# Altium PCB video.altium-saved.PcbDoc (part 4 of 5)
Units mil, origin at the board's own origin, x right, y up, seen from the top; angles counter-clockwise.
Board outline 12285 x 4200 mil, 4 copper layers (top_copper, Mid-Layer 1, Mid-Layer 2, Bottom Layer), stack 68.6 mil thick; 189 components, 588 nets, 2118 pads, 808 vias.
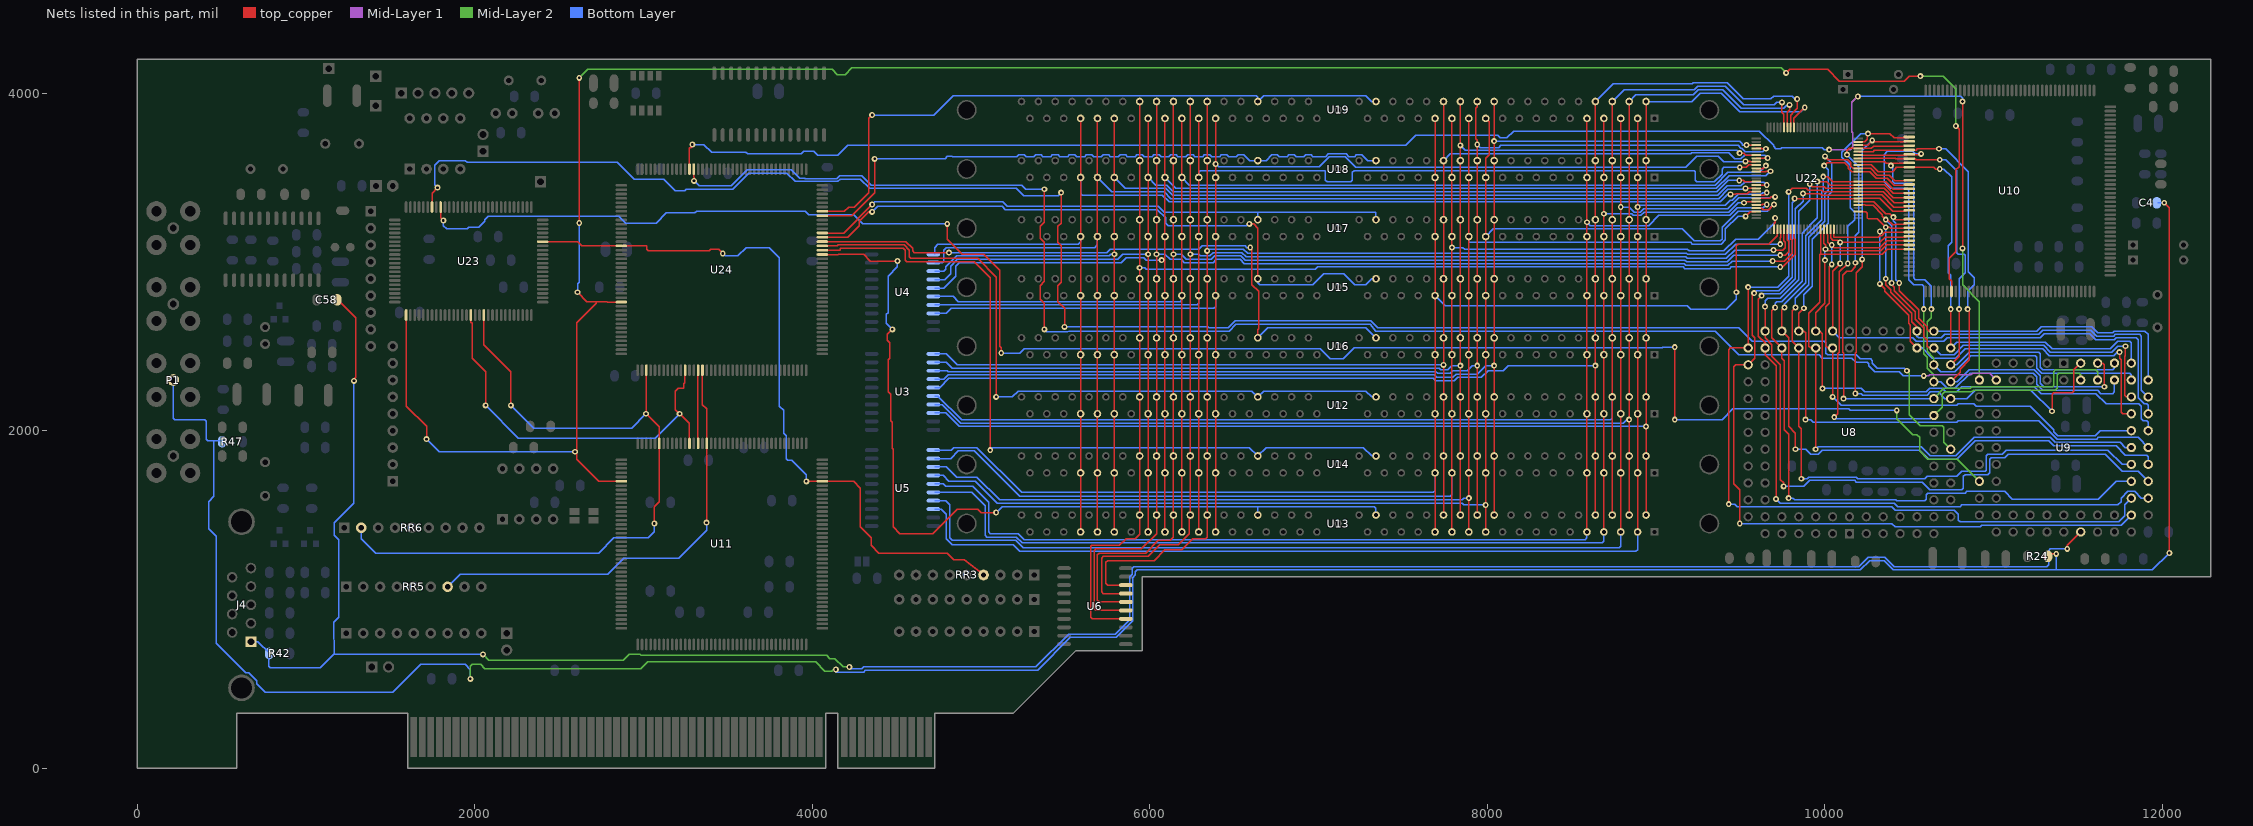
[diagram p6: the nets of this part, all layers, seen from the top]

## Via types
v1: diameter 35, hole 15.75, top_copper to Bottom Layer, 807 vias
v2: diameter 31.5, hole 15.75, top_copper to Bottom Layer, 1 vias

## Nets (pads, with @x,y where several pads share a name; then routed paths per layer and width w, separated by ;. In a path a pad name is that pad's centre, name@x,y a point inside that pad or via, vN(x,y) a via of type N, cw(c..) or ccw(c..) an arc to the next point about the centre after c; other vN are vias at no path point) (continued)
/PTRDY-: RR6.2 U11.115 U23.19 U24.3 | length 4370
  top_copper w7.87: U23.19@2055,2690 2055,2510 2215,2350 v1(2215,2150) ; v1(3015,2100) v1@3016,2100 ; U24.3@3016,2340 v1@3016,2100 ; v1(3065,1450) 3065,1550 3093,1578 3093,1943 3093,2023 v1@3016,2100
  Bottom Layer w7.87: RR6.2@1328.58,1425 1328.58,1360.43 1414.02,1275 2735,1275 2825,1365 3030,1365 3065,1400 v1(3065,1450) ; v1(2215,2150) 2350,2015 2930,2015 v1(3015,2100)
/PTWR: U11.108 U23.16 U24.12 | length 2349.1
  top_copper w7.87: U23.16@1978,2690 1978,2640 1985,2640 1985,2430 2065,2350 v1(2065,2150) ; U24.12@3246,2340 3246,2280 3240,2280 3240,2250 3205,2250 3190,2235 3190,2125 v1(3215,2100) 3272,2043 U11.108@3272,1943
  Bottom Layer w7.87: v1(2065,2150) 2260,1955 3070,1955 v1(3215,2100)
/RAS0-: U19.34 U19.44 U24.74 | length 3862
  top_copper w7.87: U24.74@4078,3299 4190,3299 4216,3325 4250,3325 4335,3410 4335,3850 v1(4355,3870)
  Bottom Layer w7.87: v1(4355,3870) 4720,3870 4835,3985 6630,3985 6640,3975 U19.44@6640,3950 6675,3985 7280,3985 7315,3950 U19.34@7340,3950
/RAS1-: U18.34 U18.44 U24.73 | length 3720
  top_copper w7.87: U24.73@4078,3274 4234,3274 4370,3410 v1(4370,3610.63)
  Bottom Layer w7.87: v1(4370,3610.63) 4787.15,3610.63 4800.9,3624.37 4829.1,3624.37 4829.35,3624.13 5213.25,3624.13 5223.5,3634.37 5256.5,3634.37 5266.75,3624.13 5313.25,3624.13 5323.5,3634.37 5356.5,3634.37 5366.75,3624.13 5413.25,3624.13 5423.5,3634.37 5456.5,3634.37 5466.75,3624.13 5513.25,3624.13 5523.5,3634.37 5556.5,3634.37 5566.75,3624.13 5613.25,3624.13 5623.5,3634.37 5656.5,3634.37 5666.75,3624.13 5713.25,3624.13 5723.5,3634.37 5756.5,3634.37 5766.75,3624.13 5813.25,3624.13 5823.5,3634.37 5856.5,3634.37 5866.75,3624.13 5913.25,3624.13 5923.5,3634.37 5956.5,3634.37 5966.75,3624.13 6013.25,3624.13 6023.5,3634.37 6056.5,3634.37 6066.75,3624.13 6113.25,3624.13 6123.5,3634.37 6156.5,3634.37 6166.75,3624.13 6213.25,3624.13 6223.5,3634.37 6256.5,3634.37 6266.75,3624.13 6313.25,3624.13 6323.5,3634.37 6356.5,3634.37 6366.75,3624.13 6413.25,3624.13 6423.5,3634.37 6456.5,3634.37 6466.75,3624.13 6513.25,3624.13 6523.5,3634.37 6556.5,3634.37 6590.87,3600 U18.44@6640,3600 6689.13,3600 6723.5,3634.37 6756.5,3634.37 6766.75,3624.13 6813.25,3624.13 6823.5,3634.37 6856.5,3634.37 6866.75,3624.13 6913.25,3624.13 6923.5,3634.37 6956.5,3634.37 6966.75,3624.13 7041.68,3624.13 7056.68,3639.13 7163.32,3639.13 7178.32,3624.13 7213.25,3624.13 7223.5,3634.37 7256.5,3634.37 7290.87,3600 U18.34@7340,3600
/RAS2-: U17.34 U17.44 U24.69 | length 3453.1
  top_copper w7.87: U24.69@4078,3171 4186,3171 v1(4355,3340)
  Bottom Layer w7.87: v1(4355,3340) 4370,3355 5130,3355 5155,3330 6050,3330 6085,3295 6640,3295 ; U17.44@6640,3250 6640,3295 ; U17.34@7340,3250 7340,3295 6640,3295
/RAS3-: U15.34 U15.44 U24.68 | length 3830.1
  top_copper w7.87: U24.68@4078,3146 4210,3146 4279,3215 4279,3240 4335,3296 v1(4355,3296) ; v1(6590,3225) 6615,3225 6640,3200 U15.44@6640,2900
  Bottom Layer w7.87: v1(4355,3296) 4389,3330 5125,3330 5145,3310 6045,3310 6095,3260 6095,3230 6110,3215 6570,3215 6580,3225 v1(6590,3225) ; U15.44@6640,2900 6640,2875 6650,2865 6965,2865 7030,2930 7150,2930 7215,2865 7280,2865 7315,2900 U15.34@7340,2900
/RAS4-: U16.34 U16.44 U24.67 | length 3883.8
  top_copper w7.87: U24.67@4078,3120 4555,3120 4595,3080 4595,3065 4605,3055 v1(4810,3055) ; v1(6595,3085) 6605,3075 6605,2865 6645,2825 6645,2600 6640,2600 U16.44@6640,2550
  Bottom Layer w7.87: v1(4810,3055) 5745,3055 5765,3075 6290,3075 6310,3095 6565,3095 6575,3085 v1(6595,3085) ; U16.44@6640,2550 6700,2610 7280,2610 U16.34@7340,2550
/RAS5-: U12.34 U12.44 U24.66 | length 4137.1
  top_copper w7.87: U24.66@4078,3095 4150,3095 4150,3100 4545,3100 4575,3070 4575,3030 4585,3020 4980,3020 5090,2910 v1(5090,2200)
  Bottom Layer w7.87: v1(5090,2200) 5185,2200 5220,2235 6605,2235 U12.44@6640,2200 6675,2235 7280,2235 7315,2200 U12.34@7340,2200
/RAS6-: U14.34 U14.44 U24.65 | length 4469
  top_copper w7.87: U24.65@4078,3069 4165,3069 4165,3080 4540,3080 4550,3070 4550,3010 4560,3000 4960,3000 5055,2905 v1(5055,1885)
  Bottom Layer w7.87: v1(5055,1885) 5070,1900 6590,1900 U14.44@6640,1850 6690,1900 7265,1900 7315,1850 U14.34@7340,1850
/RAS7-: U13.34 U13.44 U24.64 | length 5150.8
  top_copper w7.87: U24.64@4078,3043 4155,3043 4155,3045 4305,3045 4345,3005 v1(4505,3005) ; v1(4475,2600) 4445,2570 4445,2535 4460,2520 4460,2430 4450,2420 4450,2230 4465,2215 4465,2060 4475,2050 4475,1895 4480,1890 4480,1430 4520,1390 4715,1390 4860,1535 4980,1535 5000,1515 v1(5090,1515)
  Bottom Layer w7.87: v1(4475,2600) 4440,2635 4440,2690 4450,2700 4450,2915 4505,2970 v1(4505,3005) ; v1(5090,1515) 5125,1550 6640,1550 ; U13.44@6640,1500 6640,1550 ; U13.34@7340,1500 7340,1540 7330,1550 6640,1550
/RDCAD-: U8.20 U23.74 | length 10848.6
  top_copper w7.87: U23.74@1748,3320 1748,3408 v1(1780,3440) ; v1(5475,3410) 5475,3230 5455,3210 5455,3115 5475,3095 5475,2880 5455,2860 5455,2765 5495,2725 v1(5495,2615)
  Mid-Layer 2 w7.87: v1(10485,2355) 10500,2340 10500,2095 10565,2030 10695,2030 10705,2020 10705,1930 U8.20@10745,1890
  Bottom Layer w7.87: v1(1780,3440) 1762.5,3457.5 1762.5,3572.5 1790,3600 1945,3600 1955.75,3589.25 2845.75,3589.25 2945,3490 3120,3490 3190,3420 3245,3420 3255,3430 3530,3430 3625,3525 3850,3525 3898.76,3476.24 4056.31,3476.24 4056.43,3476.36 4123.57,3476.36 4123.69,3476.24 4152.21,3476.24 4165.97,3490 4285,3490 4340,3435 5210,3435 5252.5,3392.5 5457.5,3392.5 v1(5475,3410) ; v1(5495,2615) 6345,2615 6350,2610 6465,2610 6505,2650 7310,2650 7350,2610 9490,2610 9570,2530 9995,2530 10005,2520 10005,2460 10015,2450 10185,2450 10210,2425 10270,2425 10280,2415 10280,2400 10310,2370 10470,2370 v1(10485,2355)
/RDCDA-: U9.22 U23.72 | length 10760.2
  top_copper w7.87: U23.72@1799,3320 1800,3320 1800,3260 v1(1815,3245) ; v1(4800,3225) 4800,3135 4890,3045 5015,3045 5110,2950 5110,2500 5120,2490 v1(5120,2460) ; v1(9110,2065) v1(9110,2495)
  Mid-Layer 2 w7.87: v1(10425,2120) 10425,2070 10520,1975 10545,1975 10560,1960 10560,1880 10610,1830 10785,1830 U9.22@10915,1700
  Bottom Layer w7.87: v1(1815,3245) 1815,3215 1835,3195 1955,3195 1965,3205 2025,3205 2060,3240 2060,3250 2080,3270 2855,3270 2895,3230 3075,3230 3135,3290 3305,3290 3315,3300 3960,3300 3980,3280 4245,3280 4300,3225 v1(4800,3225) ; v1(5120,2460) 5230,2460 5255,2485 7010,2485 7070,2425 7145,2425 7210,2490 9035,2490 9040,2495 v1(9110,2495) ; v1(9110,2065) 9390,2065 9455,2130 10140,2130 10150,2120 v1(10425,2120)
/RDEMPTY: U11.106 U24.15 | length 397
  top_copper w7.87: U11.106@3323,1943 U24.15@3323,2340
/RDFIFO-: RR5.7 U11.104 U24.16 | length 2613.7
  top_copper w7.87: U24.16@3349,2340 3349,2155 3374,2130 3374,1943 v1(3374,1455)
  Bottom Layer w7.87: RR5.7@1840,1075 1915,1150 2790,1150 2885,1245 3210,1245 3365,1400 3365,1401 3374,1410 v1(3374,1455)
/RED_IN: C4.2 P1.1 R24.1 R47.1 | length 16629.7
  top_copper w7.87: R24.1@11325,1255 11325,1270 v1(11370,1270) ; v1(12010,3350) 12040,3320 v1(12040,1275)
  Mid-Layer 2 w7.87: v1(1975,530) 1975,605 1985,615 2035,615 2060,590 2985,590 3025,630 4020,630 4075,575 4115,575 4125,585 v1(4140,585)
  Bottom Layer w7.87: P1.1@215,2300 215,2075 225,2065 400,2065 410,2055 410,1950 420,1940 455,1940 ; R47.1@500,1935 500,1940 455,1940 ; v1(1975,530) 1975,585 1945,615 1680,615 1515,450 760,450 709.65,500.35 709.65,519.45 662.56,566.54 643.46,566.54 470,740 470,1375 425,1420 425,1580 455,1610 455,1940 ; v1(4140,585) 4140,570 4305,570 4315,580 5335,580 5530,775 5800,775 5900,875 5900,1130 5915,1145 5915,1165 5925,1175 10210,1175 10265,1230 10350,1230 10405,1175 11370,1175 ; v1(11370,1270) 11370,1175 ; C4.2@11970,3350 v1(12010,3350) ; v1(12040,1275) 11940,1175 11370,1175
/RED_OUT: C58.2 J4.1 R42.2 U9.37 | length 13900.6
  top_copper w7.87: C58.2@1190,2775 1295,2670 1295,2315 1285,2305 v1(1285,2295) ; v1(11435,1300) 11435,1320 U9.37@11515,1400
  Mid-Layer 2 w7.87: v1(2050,675) 2085,640 2880,640 2915,675 2980,675 2985,670 4085,670 4105,650 4135,650 4185,600 v1(4220,600)
  Bottom Layer w7.87: J4.1@665,750 715,750 785,680 780,680 780,605 790,595 1085,595 1165,675 ; v1(1285,2295) 1285,1570 1169.53,1454.53 1169.53,1380.34 1195.81,1354.06 1195.81,908.54 1195,907.73 1195,895 1165,865 1165,763.38 1169.31,759.07 1169.31,679.31 1165,675 ; v1(2050,675) 1165,675 ; v1(4220,600) 4230,590 4295,590 4305,600 5325,600 5520,795 5795,795 5880,880 5880,1135 5895,1150 5895,1185 5905,1195 10200,1195 10255,1250 10355,1250 10410,1195 11315,1195 11325,1205 11325,1290 11335,1300 v1(11435,1300)
/SELECT-: RR3.4 U11.75 U23.45 U24.135 | length 4346.4
  top_copper w7.87: U23.45@2400,3120 2610,3120 2635,3095 2850,3095 3020,3095 3020,3075 3030,3065 3390,3065 3400,3075 3445,3075 v1(3470,3050) ; v1(3965,1700) 4078,1700 4245,1700 4285,1660 4285,1430 4350,1365 4350,1320 4395,1275 4800,1275 4840,1235 4900,1235 RR3.4@5015,1145
  Bottom Layer w7.87: v1(3470,3050) 3485,3035 3560,3035 3610,3085 3745,3085 3805,3025 3805,2145 3830,2120 3830,1985 3845,1970 3845,1835 3855,1825 3880,1825 3965,1740 v1(3965,1700)
/SYSRST-: U10.87 U11.126 U23.1 U24.148 | length 14093.3
  top_copper w7.87: U23.1@1594,2690 1594,2146 1715,2025 v1(1715,1950) ; v1(2595,1875) v1@2605,1875 ; v1(2610,2820) 2665,2765 2720,2765 ; v1(2620,3230) v1(2620,4090) ; U11.126@2850,1700 2735,1700 2605,1830 v1@2605,1875 ; U24.148@2850,2762 2785,2762 2785,2765 2720,2765 ; v1(9770,4120) 9790,4140 10015,4140 10085,4070 10470,4070 10500,4100 v1(10565,4100) ; U10.87@10751,2802 10751,2885 10735,2901 10735,3020 10775,3060 10775,3545 10795,3565 10795,3785 v1(10775,3805) ; v1@2605,1875 2605,2640 2720,2755 2720,2765
  Mid-Layer 2 w7.87: v1(2620,4090) 2670,4140 4117.84,4140 4147.84,4110 4195,4110 4235,4150 9740,4150 v1(9770,4120) ; v1(10565,4100) 10700,4100 10775,4025 v1(10775,3805)
  Bottom Layer w7.87: v1(1715,1950) 1790,1875 v1(2595,1875) ; v1(2610,2820) 2610,2870 2620,2880 v1(2620,3230)
/TVB0: U8.32 U9.61 U10.55 U22.92 | length 2877.4
  top_copper w7.87: U22.92@10200,3574 10275,3574 10315,3535 10400,3535 10420,3555 10420,3560 10480,3560 10482,3557 10490,3560 10645,3560 10655,3550 v1(10680,3550) ; U8.32@10745,2490 v1(10745,2720)
  Bottom Layer w7.87: v1(10680,3550) 10705,3550 10750,3505 10750,3115 10730,3095 10730,2935 10745,2920 v1(10745,2720) ; U8.32@10745,2490 10780,2525 11305,2525 11345,2485 11690,2485 11735,2530 11805,2530 11815,2520 U9.61@11815,2400
/TVB1: U8.31 U9.62 U10.54 U22.93 | length 3045.4
  top_copper w7.87: U22.93@10200,3594 10355,3594 10364,3585 v1@10390,3585 ; v1(10390,3570) v1@10390,3585 ; U10.54@10485,3585 v1@10390,3585
  Mid-Layer 2 w7.87: v1(10630,2720) 10630,2670 10605,2645 10605,2470 10645,2430 U8.31@10645,2390
  Bottom Layer w7.87: v1(10390,3570) 10400,3560 10400,3475 10410,3465 10515,3465 10525,3455 10525,2905 10535,2895 10590,2895 10630,2855 v1(10630,2720) ; U8.31@10645,2390 10685,2350 10770,2350 10865,2445 11245,2445 11255,2435 11255,2370 11285,2340 11805,2340 11815,2330 U9.62@11815,2300
/TVB2: U8.30 U9.63 U10.53 U22.94 | length 2964.1
  top_copper w7.87: U22.94@10198.15,3613.11 10416.89,3613.11 10418.07,3611.93 10495.79,3611.93 10533.78,3611.93 10540.71,3605 v1(10680,3605) ; U8.30@10745,2390 10795,2440 v1(10795,2720)
  Bottom Layer w7.87: v1(10680,3605) 10715,3605 10780,3540 10780,3055 10790,3045 10825,3045 10830,3040 10830,2935 10795,2900 v1(10795,2720) ; U8.30@10745,2390 10780,2390 10855,2465 11265,2465 11275,2455 11275,2375 11290,2360 11705,2360 11715,2370 U9.63@11715,2400
/TVB3: U8.29 U9.64 U10.52 U22.95 | length 3439.1
  top_copper w7.87: U22.95@10200,3633 10485,3633 10482,3634 10485,3635 10565,3635 v1(10570,3640)
  Mid-Layer 2 w7.87: v1(10585,2720) 10585,2455 10605,2435 10605,2370 10645,2330 U8.29@10645,2290
  Bottom Layer w7.87: v1(10570,3640) 10535,3640 10520,3655 10370,3655 10350,3635 10350,3475 10390,3435 10485,3435 10495,3425 10495,2895 10525,2865 10575,2865 10585,2855 v1(10585,2720) ; U8.29@10645,2290 10685,2290 10725,2250 10770,2250 10860,2340 11235,2340 11255,2320 11255,2275 11290,2240 11615,2240 11635,2220 11705,2220 11715,2230 U9.64@11715,2300
/TVB4: U8.28 U9.65 U10.51 U22.96 | length 3233.6
  top_copper w7.87: U22.96@10200,3653 10285,3653 10292,3660 U10.51@10480,3660 ; U10.51@10482,3659 U10.51@10480,3660 ; v1(10675,3670) 10545,3670 10545,3660 U10.51@10480,3660 ; U8.28@10745,2290 10800,2345 10800,2365 10855,2420 10855,2720 v1(10845,2720) ; U9.65@11615,2400 11645,2400 11655,2390 v1(11655,2260)
  Bottom Layer w7.87: v1(10675,3670) 10715,3670 10850,3535 10850,2940 10885,2905 10885,2865 10845,2825 v1(10845,2720) ; U8.28@10745,2290 10785,2290 10855,2360 11240,2360 11275,2325 11275,2280 11295,2260 v1(11655,2260)
/TVB5: U8.27 U9.66 U10.50 U22.97 | length 3596.8
  top_copper w7.87: v1(10110,2190) 10110,2460 10105,2465 10105,2920 10130,2945 10155,2945 10180,2970 v1(10180,2995) ; v1(10130,3635) 10130,3659.75 10142.42,3672.17 10198.15,3672.17 10274.83,3672.17 10275,3672 10288,3685 U10.50@10482,3685
  Mid-Layer 2 w7.87: U8.27@10645,2190 10705,2250 10860,2250 10870,2260 11350,2260 11355,2265 11355,2350 11365,2360 11605,2360 11615,2350 U9.66@11615,2300
  Bottom Layer w7.87: v1(10110,2190) U8.27@10645,2190 ; v1(10130,3635) 10200,3565 10200,3175 10180,3155 v1(10180,2995)
/TVB6: U8.26 U9.67 U10.49 U22.98 | length 3525.1
  top_copper w7.87: v1(10180,2220) 10180,2460 10185,2465 10185,2935 10220,2970 v1(10220,3015) ; U22.98@10200,3692 10252,3692 v1(10280,3720) 10289,3711 U10.49@10482,3711 ; v1(11345,2115) 11345,2215 11355,2225 11465,2225 11475,2235 11475,2360 U9.67@11515,2400
  Bottom Layer w7.87: v1(10180,2220) 10215,2220 10225,2210 10605,2210 10625,2230 10670,2230 10710,2190 U8.26@10745,2190 10840,2190 10890,2240 11220,2240 v1(11345,2115) ; v1(10220,3015) 10220,3660 v1(10280,3720)
/TVB7: U8.25 U9.68 U10.48 U22.99 | length 3878.8
  top_copper w7.87: v1(10055,2080) 10075,2100 10075,2455 10085,2465 10085,2940 v1(10135,2990) ; U22.99@10200,3712 10234.73,3712 10250,3727.27 10250,3755 v1(10255,3760) 10385,3760 10409,3736 U10.48@10482,3736
  Mid-Layer 2 w7.87: U8.25@10645,2090 10695,2140 10695,2215 10710,2230 10870,2230 10880,2240 11365,2240 11375,2250 11375,2330 11385,2340 11505,2340 11515,2330 U9.68@11515,2300
  Bottom Layer w7.87: v1(10055,2080) 10065,2070 10625,2070 U8.25@10645,2090 ; v1(10135,2990) 10135,3210 10175,3250 10175,3295 10150,3320 10150,3571.62 10100.69,3620.93 10100.69,3649.07 10211.62,3760 v1(10255,3760)
/TVG0: U8.48 U9.53 U10.74 U22.67 | length 3854.6
  top_copper w7.87: v1(9945,1890) U8.48@9945,2490 9915,2490 9905,2500 9905,2695 9970,2760 9970,3045 ; U22.67@9974,3190 9974,3049 9970,3045 ; U10.74@10480,3075 10370,3075 10340,3045 9970,3045
  Bottom Layer w7.87: v1(9945,1890) 9960,1905 10570,1905 10625,1850 10775,1850 10885,1960 11335,1960 11365,1930 11750,1930 11780,1900 U9.53@11815,1900
/TVG1: U8.47 U9.54 U10.73 U22.68 | length 3640.7
  top_copper w7.87: v1(9985,2250) 9985,2575 9970,2590 U8.47@9945,2590 9945,2700 10000,2755 v1(10000,3010) ; U22.68@9994,3190 9994,3109.06 10003.31,3099.75 v1(10003.31,3075) 10013.31,3065 10330,3065 10365,3100 U10.73@10478,3100
  Bottom Layer w7.87: v1(9985,2250) 10215,2250 10235,2230 10600,2230 10620,2250 10695,2250 10715,2230 10780,2230 10810,2260 11240,2260 11280,2220 11605,2220 11665,2160 11860,2160 11875,2145 11875,2070 11885,2060 11905,2060 11915,2050 U9.54@11915,2000 ; v1(10000,3010) 10000,3071.69 v1(10003.31,3075)
/TVG2: U8.46 U9.55 U10.72 U22.69 | length 3411.5
  top_copper w7.87: U22.69@10013,3190 10013,3160 10015,3160 10015,3115 10030,3100 v1(10040,3100) 10055,3085 10325,3085 10365,3125 U10.72@10480,3125 ; v1(10040,2985) 10025,2970 10025,2755 10005,2735 10005,2500 10015,2490 U8.46@10045,2490 v1(10045,2200)
  Bottom Layer w7.87: v1(10040,2985) v1(10040,3100) ; v1(10045,2200) 10095,2150 10780,2150 10790,2160 10880,2160 10895,2145 11215,2145 11355,2005 11355,1995 11380,1970 11600,1970 11630,2000 U9.55@11815,2000
/TVG3: U8.45 U9.56 U10.71 U22.70 | length 3414.7
  top_copper w7.87: U22.70@10033,3190 10033,3142.73 10046.48,3129.25 10076.44,3129.25 v1(10090,3115.69) 10325.69,3115.69 10357,3147 U10.71@10482,3147 ; U8.45@10045,2590 10045,2945 v1(10090,2990)
  Bottom Layer w7.87: U8.45@10045,2590 10085,2550 10520,2550 10540,2530 10705,2530 10725,2550 11275,2550 11300,2575 11570,2575 11605,2540 11715,2540 11725,2550 11845,2550 11855,2540 11855,2195 11890,2160 11905,2160 11915,2150 U9.56@11915,2100 ; v1(10090,2990) v1(10090,3115.69)
/TVG4: U8.36 U9.57 U10.70 U22.71 | length 2991.3
  top_copper w7.87: U22.71@10053,3190 10053,3145 10315,3145 10325,3155 ; v1(10325,2870) 10355,2840 10355,2825 10495,2685 10495,2635 10505,2625 10505,2530 U8.36@10545,2490 ; v1(10325,3180) 10325,3155 ; U10.70@10485,3175 10355,3175 10335,3155 10325,3155 ; v1(11745,2465) 11745,2430 11755,2420 11755,2110 11765,2100 U9.57@11815,2100
  Bottom Layer w7.87: v1(10325,2870) v1(10325,3180) ; U8.36@10545,2490 10575,2490 10635,2430 10775,2430 10830,2485 11290,2485 11330,2445 11710,2445 11730,2465 v1(11745,2465)
/TVG5: U8.35 U9.58 U10.69 U22.78 | length 2813.8
  top_copper w7.87: U22.78@10198.15,3298.15 10241.85,3298.15 10250.69,3289.31 10250.69,3259.31 10255,3255 10310,3255 v1(10360,3205) 10385,3205 10390,3200 U10.69@10480,3200 ; v1(10360,2900) 10360,2865 10390,2835 10390,2820 10515,2695 10515,2645 10545,2615 U8.35@10545,2590
  Bottom Layer w7.87: v1(10360,2900) v1(10360,3205) ; U8.35@10545,2590 10545,2560 10555,2550 10690,2550 10710,2570 11265,2570 11290,2595 11575,2595 11610,2560 11710,2560 11720,2570 11865,2570 11875,2560 11875,2240 U9.58@11915,2200
/TVG6: U8.34 U9.59 U10.68 U22.80 | length 2779.7
  top_copper w7.87: U22.80@10200,3338 10240,3338 10240,3335 10285,3335 10340,3280 10340,3270 v1(10360,3250) 10370,3250 10400,3220 10420,3220 10420,3224 U10.68@10482,3224 ; v1(10395,2875) 10395,2865 10410,2850 10410,2830 10535,2705 10535,2660 10585,2610 10585,2555 10605,2535 10605,2500 10615,2490 U8.34@10645,2490 ; v1(11780,2500) 11780,2445 11775,2440 11775,2210 11785,2200 U9.59@11815,2200
  Bottom Layer w7.87: v1(10360,3250) 10395,3215 v1(10395,2875) ; U8.34@10645,2490 10685,2450 10765,2450 10820,2505 11295,2505 11335,2465 11700,2465 11735,2500 v1(11780,2500)
/TVG7: U8.33 U9.60 U10.67 U22.81 | length 2699.7
  top_copper w7.87: U22.81@10200,3357 10250,3357 10250,3355 10290,3355 10360,3285 10385,3285 v1(10405,3265) 10415,3255 10415,3250 U10.67@10482,3250 ; v1(10440,2875) 10440,2830 10555,2715 10555,2665 10605,2615 10605,2600 10615,2590 U8.33@10645,2590
  Bottom Layer w7.87: v1(10405,3265) 10405,3245 10420,3230 10420,2895 v1(10440,2875) ; U8.33@10645,2590 11255,2590 11280,2615 11580,2615 11615,2580 11705,2580 11715,2590 11895,2590 11915,2570 U9.60@11915,2300
/TVI0: U9.10 U24.108 | length 9837.4
  top_copper w7.87: U24.108@3272,3568 3272,3675 3280,3675 3290,3685 v1(3290,3695) ; v1(10815,3080) v1(10815,3950)
  Mid-Layer 1 w7.87: v1(10025,3665) 10150,3665 10165.94,3680.94 10165.94,3766.09 10160,3772.03 10160,3945 v1(10195,3980)
  Mid-Layer 2 w7.87: v1(10815,3080) 10815,2865 10915,2765 U9.10@10915,2300
  Bottom Layer w7.87: v1(3290,3695) 3357.55,3695 3403.42,3649.13 3607.58,3649.13 3616.95,3639.75 3934.1,3639.75 3949.41,3655.06 4009.02,3655.06 4033.25,3630.83 4150.83,3630.83 4210,3690 7515,3690 7575,3750 8060,3750 8075,3735 8115,3735 8155,3775 9610.65,3775 9695.06,3690.59 9695.06,3684.45 9708.82,3670.69 9739.07,3670.69 9743.38,3675 9985,3675 9995,3665 v1(10025,3665) ; v1(10195,3980) 10805,3980 10815,3970 v1(10815,3950)
/TVI1: U9.11 U24.107 | length 8973.3
  top_copper w7.87: U24.107@3297,3568 3297,3500 3300,3500 v1(3300,3480) ; v1(5375,2600) 5375,2755 5350,2780 5350,2860 5375,2885 5375,3115 5350,3140 5350,3210 5375,3235 v1(5375,3430)
  Mid-Layer 1 w7.87: v1(10585,2325) 10615,2325 10620,2330 10865,2330 10875,2340 10975,2340 U9.11@11015,2300
  Bottom Layer w7.87: v1(3300,3480) 3330,3450 3520,3450 3615,3545 3875,3545 3925.43,3494.57 3956.87,3494.57 3959.47,3491.97 4049.8,3491.97 4049.92,3492.09 4144.95,3492.09 4145.07,3491.97 ; 4145.08,3491.97 4145.2,3492.09 4145.4,3492.09 4147.88,3494.57 4148.08,3494.57 4163.52,3510 4295,3510 4350,3455 5240,3455 5265,3430 v1(5375,3430) ; v1(5375,2600) 5390,2585 5515,2585 5520,2590 6470,2590 6510,2630 7305,2630 7340,2590 9350,2590 9490,2450 9965,2450 9985,2430 10160,2430 10185,2405 10250,2405 10260,2395 10260,2385 10295,2350 10440,2350 10465,2325 v1(10585,2325)
/TVR0: U8.56 U9.45 U10.65 U22.82 | length 5274.5
  top_copper w7.87: v1(9495,1450) 9495,1650 9460,1685 9460,2380 9470,2390 U8.56@9545,2390 9585,2430 9585,2550 9570,2565 9570,2805 v1(9580,2815) ; v1(9820,3375) 10200,3375 10200,3377 10325,3377 10402,3300 10480,3300 U10.65@10482,3301
  Bottom Layer w7.87: v1(9495,1450) 10395,1450 10415,1430 10920,1430 10930,1440 11755,1440 U9.45@11815,1500 ; v1(9580,2815) 9595,2830 9725,2830 9805,2910 9805,3350 9820,3365 v1(9820,3375)
/TVR1: U8.55 U9.46 U10.64 U22.83 | length 4959.2
  top_copper w7.87: v1(9625,2800) 9605,2780 9605,2560 9645,2520 U8.55@9645,2490 9645,2450 9710,2385 v1(9710,1595) ; v1(9870,3405) 9970,3405 9980,3395 10200,3395 10200,3397 10335,3397 10407,3325 10470,3325 U10.64@10482,3327
  Bottom Layer w7.87: v1(9625,2800) 9635,2810 9735,2810 9825,2900 9825,3315 9870,3360 v1(9870,3405) ; v1(9710,1595) 9735,1570 10410,1570 10430,1550 10800,1550 10810,1560 11735,1560 11755,1580 11755,1600 11795,1640 11835,1640 11875,1600 U9.46@11915,1600
/TVR2: U8.54 U9.47 U10.63 U22.84 | length 5447.9
  top_copper w7.87: v1(9430,1565) 9430,2480 9440,2490 U8.54@9545,2490 v1(9545,2850) ; v1(9785,3415) 9805,3435 9890,3435 9900,3425 9980,3425 9990,3415 10200,3415 10200,3416 10345,3416 10410,3351 10480,3351 U10.63@10482,3352
  Bottom Layer w7.87: v1(9430,1565) 9465,1565 9480,1550 10395,1550 10415,1530 10765,1530 10790,1505 10790,1470 10800,1460 11740,1460 11775,1495 11775,1560 U9.47@11815,1600 ; v1(9545,2850) 9720,2850 9785,2915 v1(9785,3415)
/TVR3: U8.53 U9.48 U10.62 U22.85 | length 5034.4
  top_copper w7.87: v1(9645,2735) U8.53@9645,2590 9645,2550 9685,2510 9685,2440 9735,2390 9735,1710 9755,1690 v1(9755,1670) ; v1(9910,3460) 9925,3445 9995,3445 10005,3435 10200,3435 10200,3436 10350,3436 10405,3381 10475,3381 U10.62@10482,3378
  Bottom Layer w7.87: v1(9645,2735) 9645,2770 9660,2785 9735,2785 9845,2895 9845,3300 9910,3365 v1(9910,3460) ; v1(9755,1670) 9875,1670 9910,1705 10175,1705 10185,1695 10575,1695 10620,1650 10810,1650 10820,1660 10820,1730 10830,1740 10965,1740 10975,1750 10975,1830 10985,1840 11065,1840 11085,1860 11660,1860 11760,1760 11855,1760 U9.48@11915,1700
/TVR4: U8.52 U9.49 U10.61 U22.86 | length 4739.2
  top_copper w7.87: v1(9705,2730) 9685,2710 9685,2550 U8.52@9745,2490 9745,2430 9760,2415 9760,2005 9785,1980 v1(9785,1600) ; v1(9955,3475) 10010,3475 10030,3455 10200,3455 10200,3456 10355,3456 10405,3406 10475,3406 U10.61@10482,3403
  Bottom Layer w7.87: v1(9705,2730) 9705,2755 9715,2765 9745,2765 9865,2885 9865,3170 9955,3260 v1(9955,3475) ; v1(9785,1600) 9810,1600 9820,1590 10420,1590 10425,1585 10590,1585 10600,1595 10600,1620 10610,1630 10830,1630 10840,1640 11065,1640 11110,1595 11620,1595 11725,1700 U9.49@11815,1700
/TVR5: U8.51 U9.50 U10.60 U22.87 | length 4540
  top_copper w7.87: v1(9760,2730) 9745,2715 U8.51@9745,2590 9785,2550 9785,2025 9825,1985 v1(9825,1890) ; v1(9990,3505) 10015,3505 10045,3475 10200,3475 10200,3476 10360,3476 10405,3431 10480,3431 U10.60@10482,3429
  Bottom Layer w7.87: v1(9760,2730) 9760,2750 9885,2875 9885,3155 9980,3250 9980,3415 9990,3425 v1(9990,3505) ; v1(9825,1890) 9885,1890 9915,1860 9960,1860 9985,1885 10560,1885 10615,1830 10780,1830 10890,1940 11325,1940 11355,1910 11725,1910 11780,1855 11905,1855 11915,1845 U9.50@11915,1800
/TVR6: U8.50 U9.51 U10.59 U22.90 | length 4651.1
  top_copper w7.87: v1(9825,2730) 9805,2710 9805,2530 U8.50@9845,2490 9845,2025 9860,2010 v1(9860,1715) ; v1(9995,3570) 10012.5,3587.5 10117.5,3587.5 10138.03,3566.97 10138.03,3554.92 10158.58,3534.37 U22.90@10196.67,3534.37 ; U22.90@10198.15,3534.37 10264.37,3534.37 10265,3535 10305,3495 10370,3495 10410,3455 U10.59@10482,3455
  Bottom Layer w7.87: v1(9825,2730) 9825,2785 9905,2865 9905,3145 10000,3240 10000,3405 10020,3425 10020,3545 v1(9995,3570) ; v1(9860,1715) 9895,1715 9905,1725 10185,1725 10195,1715 10590,1715 10605,1730 10780,1730 10810,1760 10950,1760 10955,1765 10955,1850 10965,1860 11050,1860 11075,1885 11675,1885 11760,1800 U9.51@11815,1800
/TVR7: U8.49 U9.52 U10.58 U22.91 | length 4383.6
  top_copper w7.87: v1(9875,2725) 9845,2695 U8.49@9845,2590 9875,2590 9885,2580 v1(9885,2065) ; v1(10000,3625) 10019.31,3605.69 10134.51,3605.69 10153.78,3586.42 10153.78,3566.73 10166.46,3554.06 U22.91@10196.67,3554.06 ; U22.91@10173.46,3554.92 10195.81,3554.92 U22.91@10196.67,3554.06 ; U10.58@10482,3480 10414,3480 10380,3514 10310,3514 10270,3554 10196.73,3554 U22.91@10196.67,3554.06
  Bottom Layer w7.87: v1(9875,2725) 9875,2805 9925,2855 9925,3135 10020,3230 10020,3395 10040,3415 10040,3585 v1(10000,3625) ; v1(9885,2065) 9915,2065 9930,2050 10780,2050 10790,2060 11265,2060 11375,1950 11610,1950 11620,1960 11855,1960 U9.52@11915,1900
/TVRAM0: U3.18 U12.2 U13.2 U14.2 U15.2 U16.2 U17.2 U18.2 U19.2 U22.17 | length 7856.3
  top_copper w7.87: U13.2@8940,1500 U14.2@8940,1850 U12.2@8940,2200 U16.2@8940,2550 U15.2@8940,2900 U17.2@8940,3250 U18.2@8940,3600 U19.2@8940,3950 ; U22.17@9816,3800 9816,3851 v1(9880,3915)
  Bottom Layer w7.87: U3.18@4725,2105 4790,2105 4870,2025 v1(8940,2025) ; U19.2@8940,3950 9210,3950 9260,4000 9385,4000 9495,3890 9855,3890 v1(9880,3915)
/TVRAM1: U3.17 U12.4 U13.4 U14.4 U15.4 U16.4 U17.4 U18.4 U19.4 U22.19 | length 7789.9
  top_copper w7.87: U13.4@8840,1500 U14.4@8840,1850 v1(8840,2065) U12.4@8840,2200 U16.4@8840,2550 U15.4@8840,2900 U17.4@8840,3250 U18.4@8840,3600 U19.4@8840,3950 ; U22.19@9777,3800 9775,3800 9775,3885 9790,3900 v1(9790,3930)
  Bottom Layer w7.87: U3.17@4725,2155 4770,2155 4880,2045 8805,2045 8825,2065 v1(8840,2065) ; U19.4@8840,3950 8880,3990 9220,3990 9250,4020 9395,4020 9505,3910 9755,3910 9770,3925 9785,3925 v1(9790,3930)
/TVRAM2: U3.16 U12.6 U13.6 U14.6 U15.6 U16.6 U17.6 U18.6 U19.6 U22.20 | length 7897.3
  top_copper w7.87: U13.6@8740,1500 U14.6@8740,1850 U12.6@8740,2200 U16.6@8740,2550 U15.6@8740,2900 U17.6@8740,3250 U18.6@8740,3600 U19.6@8740,3950 ; v1(9745,3945) 9745,3885 9755,3875 9755,3835 9757,3835 U22.20@9757,3800
  Bottom Layer w7.87: U3.16@4725,2205 4745,2205 4885,2065 8730,2065 8740,2075 U12.6@8740,2200 ; U19.6@8740,3950 8810,4020 9225,4020 9245,4040 9410,4040 9520,3930 9700,3930 9715,3945 v1(9745,3945)
/TVRAM3: U3.15 U12.8 U13.8 U14.8 U15.8 U16.8 U17.8 U18.8 U19.8 U22.18 | length 7904.8
  top_copper w7.87: U13.8@8640,1500 U14.8@8640,1850 U12.8@8640,2200 v1(8640,2385) U16.8@8640,2550 U15.8@8640,2900 U17.8@8640,3250 U18.8@8640,3600 U19.8@8640,3950 ; U22.18@9796,3800 9796,3870 9805,3879 9805,3880 9835,3910 v1(9835,3965)
  Bottom Layer w7.87: U3.15@4725,2255 4755,2255 4810,2310 7680,2310 7695,2295 7805,2295 7825,2315 7965,2315 8005,2355 8095,2355 8125,2385 v1(8640,2385) ; U19.8@8640,3950 8745,4055 9215,4055 9220,4060 9420,4060 9515,3965 9680,3965 9695,3980 9805,3980 9820,3965 v1(9835,3965)
/TVRAM4: U3.14 U12.20 U13.20 U14.20 U15.20 U16.20 U17.20 U18.20 U19.20 U22.28 | length 7374.8
  top_copper w7.87: U13.20@8040,1500 U14.20@8040,1850 U12.20@8040,2200 v1(8040,2385) U16.20@8040,2550 U15.20@8040,2900 U17.20@8040,3250 U18.20@8040,3600 v1(8040,3715) U19.20@8040,3950 ; v1(9535,3692) U22.28@9590,3692
  Bottom Layer w7.87: U3.14@4725,2305 4780,2305 4805,2330 7685,2330 7700,2315 7795,2315 7815,2335 7940,2335 7990,2385 v1(8040,2385) ; v1(8040,3715) 9495,3715 9510,3700 9510,3692 v1(9535,3692)
/TVRAM5: U3.13 U12.22 U13.22 U14.22 U15.22 U16.22 U17.22 U18.22 U19.22 U22.29 | length 7504.2
  top_copper w7.87: U13.22@7940,1500 U14.22@7940,1850 U12.22@7940,2200 7940,2390 U16.22@7940,2550 U15.22@7940,2900 U17.22@7940,3250 U18.22@7940,3600 v1(7940,3695) 7940,3720 7930,3730 7930,3910 7940,3920 U19.22@7940,3950 ; U22.29@9590,3672 9623.25,3672 9625.25,3670 v1(9650,3670)
  Bottom Layer w7.87: U3.13@4725,2355 4800,2355 4805,2350 7695,2350 7705,2340 7780,2340 7795,2355 7880,2355 7910,2385 v1(7940,2385) ; v1(7940,3695) 7957.5,3677.5 8067.5,3677.5 8080,3690 9485,3690 9501.77,3673.23 9508.15,3673.23 9528.88,3652.5 9632.5,3652.5 v1(9650,3670)
/TVRAM6: U3.12 U12.24 U13.24 U14.24 U15.24 U16.24 U17.24 U18.24 U19.24 U22.31 | length 7367.6
  top_copper w7.87: U13.24@7840,1500 U14.24@7840,1850 U12.24@7840,2200 v1(7840,2385) U16.24@7840,2550 U15.24@7840,2900 U17.24@7840,3250 U18.24@7840,3600 v1(7840,3690) U19.24@7840,3950 ; v1(9494.08,3643.92) 9518.83,3643.92 9529.75,3633 U22.31@9590,3633
  Bottom Layer w7.87: U3.12@4725,2405 4795,2405 4830,2370 7715,2370 7725,2360 7765,2360 7790,2385 v1(7840,2385) ; v1(7840,3690) 7868.58,3661.42 9476.58,3661.42 v1(9494.08,3643.92)
/TVRAM7: U3.11 U12.26 U13.26 U14.26 U15.26 U16.26 U17.26 U18.26 U19.26 U22.32 | length 7529.1
  top_copper w7.87: U13.26@7740,1500 U14.26@7740,1850 U12.26@7740,2200 v1(7740,2390) U16.26@7740,2550 U15.26@7740,2900 U17.26@7740,3250 U18.26@7740,3600 U19.26@7740,3950 ; U22.32@9593.33,3613.11 9658.11,3613.11 v1(9660,3615)
  Bottom Layer w7.87: U3.11@4725,2455 4795,2455 4860,2390 v1(7740,2390) ; U18.26@7740,3600 7780,3640 9205,3640 9210,3645 9430,3645 9465,3610 9501.62,3610 9524.12,3632.5 9642.5,3632.5 v1(9660,3615)
/TVRAM8: U4.18 U12.49 U13.49 U14.49 U15.49 U16.49 U17.49 U18.49 U19.49 U22.33 | length 7497.6
  top_copper w7.87: U13.49@6390,1400 U14.49@6390,1750 U12.49@6390,2100 U16.49@6390,2450 U15.49@6390,2800 U17.49@6390,3150 U18.49@6390,3500 v1(6390,3580) U19.49@6390,3850 ; v1(9529.36,3595.76) 9554.11,3595.76 9556.86,3593 U22.33@9590,3593
  Bottom Layer w7.87: U4.18@4725,2695 4795,2695 4825,2725 6380,2725 6390,2735 U15.49@6390,2800 ; v1(6390,3580) 6407.5,3562.5 7002.5,3562.5 7063.25,3623.25 7156.75,3623.25 7220,3560 9175,3560 9240,3625 9368,3625 9400,3593 9526.6,3593 v1(9529.36,3595.76)
/TVRAM9: U4.17 U12.51 U13.51 U14.51 U15.51 U16.51 U17.51 U18.51 U19.51 U22.34 | length 7625.5
  top_copper w7.87: U13.51@6290,1400 U14.51@6290,1750 U12.51@6290,2100 U16.51@6290,2450 U15.51@6290,2800 U17.51@6290,3150 U18.51@6290,3500 U19.51@6290,3850 ; v1(9495,3560) 9535,3560 9549,3574 U22.34@9590,3574
  Bottom Layer w7.87: U4.17@4725,2745 6280,2745 6290,2755 U15.51@6290,2800 ; U18.51@6290,3500 6290,3530 6300,3540 7040,3540 7040,3485 7050,3475 7190,3475 7200,3485 7200,3530 7210,3540 9225,3540 9230,3535 9230,3485 9240,3475 9345,3475 9390,3520 9390,3550 9400,3560 v1(9495,3560)
/TVRAM10: U4.16 U12.53 U13.53 U14.53 U15.53 U16.53 U17.53 U18.53 U19.53 U22.35 | length 7548.6
  top_copper w7.87: U13.53@6190,1400 U14.53@6190,1750 U12.53@6190,2100 U16.53@6190,2450 U15.53@6190,2800 U17.53@6190,3150 U18.53@6190,3500 U19.53@6190,3850 ; U22.35@9591.5,3552.5 9632.5,3552.5 v1(9650,3570)
  Bottom Layer w7.87: U4.16@4725,2795 4835,2795 4865,2765 6180,2765 6190,2775 U15.53@6190,2800 ; U18.53@6190,3500 6235,3455 9350,3455 9425,3530 9610,3530 v1(9650,3570)
/TVRAM11: U4.15 U12.55 U13.55 U14.55 U15.55 U16.55 U17.55 U18.55 U19.55 U22.36 | length 7678
  top_copper w7.87: v1(6070,3010) 6089.17,3010 6090,3010.83 ; U13.55@6090,1400 U14.55@6090,1750 U12.55@6090,2100 U16.55@6090,2450 U15.55@6090,2800 6090,3010.83 ; U19.55@6090,3850 U18.55@6090,3500 U17.55@6090,3150 6090,3010.83 ; U22.36@9590,3534 9649.65,3534 9652.78,3537.13 v1(9677.53,3537.13)
  Bottom Layer w7.87: U4.15@4725,2845 4780,2845 4850,2915 4850,2975 4870,2995 5830,2995 5860,3025 5965,3025 5980,3010 v1(6070,3010) ; U18.55@6090,3500 6155,3435 9355,3435 9431.41,3511.41 9506.34,3511.41 9507.75,3510 9650.4,3510 v1(9677.53,3537.13)
/TVRAM12: U4.14 U12.57 U13.57 U14.57 U15.57 U16.57 U17.57 U18.57 U19.57 U22.39 | length 7469.4
  top_copper w7.87: U13.57@5990,1400 U14.57@5990,1750 U12.57@5990,2100 U16.57@5990,2450 U15.57@5990,2800 v1(5990,3045) U17.57@5990,3150 U18.57@5990,3500 U19.57@5990,3850 ; v1(9492.27,3482.1) 9517.02,3482.1 9524.12,3475 U22.39@9590,3475
  Bottom Layer w7.87: U4.14@4725,2895 4785,2895 4820,2930 4820,2975 4860,3015 5810,3015 5840,3045 v1(5990,3045) ; U18.57@5990,3500 6035,3455 6100,3455 6140,3415 9360,3415 9427.1,3482.1 v1(9492.27,3482.1)
/TVRAM13: U4.13 U12.61 U13.61 U14.61 U15.61 U16.61 U17.61 U18.61 U19.61 U22.40 | length 7578.1
  top_copper w7.87: U13.61@5790,1400 U14.61@5790,1750 U12.61@5790,2100 U16.61@5790,2450 U15.61@5790,2800 v1(5790,3045) U17.61@5790,3150 U18.61@5790,3500 U19.61@5790,3850 ; U22.40@9590,3455 v1(9655,3455)
  Bottom Layer w7.87: U4.13@4725,2945 4780,2945 4790,2955 4790,2970 4855,3035 5760,3035 5770,3045 v1(5790,3045) ; U18.61@5790,3500 5855,3435 6095,3435 6135,3395 9365,3395 9420,3450 9501.62,3450 9524.12,3472.5 9637.5,3472.5 v1(9655,3455)
/TVRAM14: U4.12 U12.63 U13.63 U14.63 U15.63 U16.63 U17.63 U18.63 U19.63 U22.41 | length 7523.6
  top_copper w7.87: U13.63@5690,1400 U14.63@5690,1750 U12.63@5690,2100 U16.63@5690,2450 U15.63@5690,2800 U17.63@5690,3150 U18.63@5690,3500 U19.63@5690,3850 ; v1(9529.24,3435.69) 9589.69,3435.69 U22.41@9590,3436
  Bottom Layer w7.87: U4.12@4725,2995 4770,2995 4780,3005 4780,3070 4795,3085 5675,3085 5690,3100 U17.63@5690,3150 ; U18.63@5690,3500 5775,3415 6085,3415 6125,3375 9370,3375 9425,3430 9523.55,3430 v1(9529.24,3435.69)
/TVRAM15: U4.11 U12.65 U13.65 U14.65 U15.65 U16.65 U17.65 U18.65 U19.65 U22.42 | length 7543.4
  top_copper w7.87: U13.65@5590,1400 U14.65@5590,1750 U12.65@5590,2100 U16.65@5590,2450 U15.65@5590,2800 U17.65@5590,3150 U18.65@5590,3500 U19.65@5590,3850 ; v1(9440,3400) 9470,3400 9470,3405 9540,3405 9551,3416 U22.42@9590,3416
  Bottom Layer w7.87: U4.11@4725,3045 4725,3085 4745,3105 5575,3105 5590,3120 U17.65@5590,3150 ; U18.65@5590,3500 5590,3405 5600,3395 6075,3395 6115,3355 9380,3355 9425,3400 v1(9440,3400)
/TVRAM16: U5.18 U12.3 U13.3 U14.3 U15.3 U16.3 U17.3 U18.3 U19.3 U22.43 | length 7783.6
  top_copper w7.87: U13.3@8890,1400 U14.3@8890,1750 U12.3@8890,2100 U16.3@8890,2450 U15.3@8890,2800 U17.3@8890,3150 v1(8890,3325) U18.3@8890,3500 U19.3@8890,3850 ; U22.43@9590,3396 9641,3396 v1(9655,3410)
  Bottom Layer w7.87: U5.18@4725,1535 4765,1535 4795,1505 4795,1360 4830,1325 5190,1325 5230,1285 8880,1285 8890,1295 U13.3@8890,1400 ; v1(8890,3325) 8900,3335 9410,3335 9440,3365 9450,3365 9485,3400 9620.25,3400 9630.25,3410 v1(9655,3410)
/TVRAM17: U5.17 U12.5 U13.5 U14.5 U15.5 U16.5 U17.5 U18.5 U19.5 U22.44 | length 7917.4
  top_copper w7.87: U13.5@8790,1400 U14.5@8790,1750 U12.5@8790,2100 U16.5@8790,2450 U15.5@8790,2800 U17.5@8790,3150 v1(8790,3325) U18.5@8790,3500 U19.5@8790,3850 ; U22.44@9590,3377 9672.25,3377 9680.25,3385 v1(9705,3385)
  Bottom Layer w7.87: U5.17@4725,1585 4790,1585 4815,1560 4815,1365 4830,1350 5205,1350 5250,1305 8780,1305 8790,1315 U13.5@8790,1400 ; v1(8790,3325) 8840,3325 8870,3295 8905,3295 8925,3315 9425,3315 9490,3380 9675.25,3380 9680.25,3385 v1(9705,3385)
/TVRAM18: U5.16 U12.7 U13.7 U14.7 U15.7 U16.7 U17.7 U18.7 U19.7 U22.45 | length 7643.1
  top_copper w7.87: U13.7@8690,1400 U14.7@8690,1750 U12.7@8690,2100 U16.7@8690,2450 U15.7@8690,2800 U17.7@8690,3150 v1(8690,3285) U18.7@8690,3500 U19.7@8690,3850 ; v1(9520,3350) 9520,3357 U22.45@9590,3357
  Bottom Layer w7.87: U5.16@4725,1635 4945,1635 5025,1555 5025,1380 5035,1370 5210,1370 5245,1335 8680,1335 8690,1345 U13.7@8690,1400 ; v1(8690,3285) 8855,3285 8865,3275 8910,3275 8930,3295 9430,3295 9485,3350 v1(9520,3350)
/TVRAM19: U5.15 U12.9 U13.9 U14.9 U15.9 U16.9 U17.9 U18.9 U19.9 U22.46 | length 7784.6
  top_copper w7.87: U13.9@8590,1400 U14.9@8590,1750 U12.9@8590,2100 U16.9@8590,2450 U15.9@8590,2800 U17.9@8590,3150 v1(8590,3235) U18.9@8590,3500 U19.9@8590,3850 ; U22.46@9590,3337 9627.25,3337 9630.25,3340 v1(9655,3340)
  Bottom Layer w7.87: U5.15@4725,1685 4775,1685 4790,1670 4950,1670 5045,1575 5045,1400 5055,1390 5220,1390 5255,1355 8580,1355 8590,1365 U13.9@8590,1400 ; v1(8590,3235) 8610,3215 8955,3215 9015,3275 9435,3275 9480,3320 9635,3320 9637.5,3322.5 v1(9655,3340)
/TVRAM20: U5.14 U12.21 U13.21 U14.21 U15.21 U16.21 U17.21 U18.21 U19.21 U22.47 | length 7813.2
  top_copper w7.87: U13.21@7990,1400 v1(7990,1560) U14.21@7990,1750 U12.21@7990,2100 U16.21@7990,2450 U15.21@7990,2800 U17.21@7990,3150 U18.21@7990,3500 7990,3615 8010,3635 8010,3830 U19.21@7990,3850 ; U22.47@9590,3318 9625.19,3318 9633.19,3310 9667.87,3310 v1(9697.87,3340)
  Bottom Layer w7.87: U5.14@4725,1735 4775,1735 4810,1700 4965,1700 5095,1570 7850,1570 7860,1560 v1(7990,1560) ; U17.21@7990,3150 8035,3195 9155,3195 9225,3125 9380,3125 9390,3135 9390,3205 9485,3300 9657.87,3300 v1(9697.87,3340)
/TVRAM21: U5.13 U12.23 U13.23 U14.23 U15.23 U16.23 U17.23 U18.23 U19.23 U22.48 | length 7558.8
  top_copper w7.87: U13.23@7890,1400 v1(7890,1600) U14.23@7890,1750 U12.23@7890,2100 U16.23@7890,2450 U15.23@7890,2800 U17.23@7890,3150 U18.23@7890,3500 U19.23@7890,3850 ; v1(9530,3270) 9555,3295 9555,3298 U22.48@9590,3298
  Bottom Layer w7.87: U5.13@4725,1785 4795,1785 4855,1725 4975,1725 5110,1590 7850,1590 7860,1600 v1(7890,1600) ; U17.23@7890,3150 7890,3115 9205,3115 9215,3105 9385,3105 9410,3130 9410,3195 9485,3270 v1(9530,3270)
/TVRAM22: U5.12 U12.25 U13.25 U14.25 U15.25 U16.25 U17.25 U18.25 U19.25 U22.53 | length 7871.1
  top_copper w7.87: U13.25@7790,1400 U14.25@7790,1750 U12.25@7790,2100 U16.25@7790,2450 U15.25@7790,2800 v1(7790,3085) U17.25@7790,3150 U18.25@7790,3500 U19.25@7790,3850 ; U22.53@9698,3190 9698,3228.25 9705,3235.25 v1(9705,3260)
  Bottom Layer w7.87: U5.12@4725,1835 4820,1835 4865,1880 4960,1880 5230,1610 7780,1610 7790,1620 U14.25@7790,1750 ; v1(7790,3085) 7855,3085 7865,3075 9185,3075 9195,3065 9400,3065 9470,3135 9604.75,3135 9705,3235.25 v1(9705,3260)
/TVRAM23: U5.11 U12.27 U13.27 U14.27 U15.27 U16.27 U17.27 U18.27 U19.27 U22.54 | length 8101
  top_copper w7.87: U13.27@7690,1400 U14.27@7690,1750 U12.27@7690,2100 U16.27@7690,2450 U15.27@7690,2800 U17.27@7690,3150 U18.27@7690,3500 U19.27@7690,3850 ; v1(9475,2820) 9475,3095 9485,3105 9668,3105 9718,3155 U22.54@9718,3190
  Bottom Layer w7.87: U5.11@4725,1885 4825,1885 4840,1900 4975,1900 5240,1635 7680,1635 7690,1645 U14.27@7690,1750 ; U15.27@7690,2800 7750,2740 9185,2740 9205,2720 9415,2720 9475,2780 v1(9475,2820)
/TVRAM24: U6.18 U12.50 U13.50 U14.50 U15.50 U16.50 U17.50 U18.50 U19.50 U22.55 | length 7018.9
  top_copper w7.87: U6.18@5865,1085 5750,1085 5740,1095 5740,1220 5750,1230 6025,1230 6090,1295 6190,1295 6255,1360 6330,1360 6340,1370 U13.50@6340,1500 U14.50@6340,1850 U12.50@6340,2200 U16.50@6340,2550 U15.50@6340,2900 v1(6340,3065) U17.50@6340,3250 U18.50@6340,3600 U19.50@6340,3950 ; v1(9735,3105) 9735,3142 9738,3145 U22.55@9738,3190
  Bottom Layer w7.87: v1(6340,3065) 6350,3075 6555,3075 6580,3050 9180,3050 9185,3045 9410,3045 9470,3105 v1(9735,3105)
/TVRAM25: U6.17 U12.52 U13.52 U14.52 U15.52 U16.52 U17.52 U18.52 U19.52 U22.56 | length 7193.4
  top_copper w7.87: U6.17@5865,1035 5725,1035 5715,1045 5715,1245 5725,1255 5990,1255 6060,1325 6170,1325 6235,1390 6235,1505 U13.52@6240,1500 U14.52@6240,1850 U12.52@6240,2200 U16.52@6240,2550 U15.52@6240,2900 v1(6240,3045) U17.52@6240,3250 U18.52@6240,3600 U19.52@6240,3950 ; v1(9695,3070) 9750,3070 9765,3085 9765,3117 9757,3125 U22.56@9757,3190
  Bottom Layer w7.87: v1(6240,3045) 6290,3045 6300,3035 6355,3035 6375,3055 6545,3055 6570,3030 9175,3030 9185,3020 9415,3020 9465,3070 v1(9695,3070)
/TVRAM26: U6.16 U12.54 U13.54 U14.54 U15.54 U16.54 U17.54 U18.54 U19.54 U22.57 | length 7361
  top_copper w7.87: U6.16@5865,985 5700,985 5690,995 5690,1265 5700,1275 5975,1275 6050,1350 6120,1350 6140,1370 U13.54@6140,1500 U14.54@6140,1850 U12.54@6140,2200 U16.54@6140,2550 U15.54@6140,2900 v1(6140,3045) U17.54@6140,3250 U18.54@6140,3600 U19.54@6140,3950 ; v1(9735,3040) 9765,3040 9785,3060 9785,3122 9777,3130 U22.57@9777,3190
  Bottom Layer w7.87: v1(6140,3045) 6185,3045 6215,3015 6365,3015 6385,3035 6540,3035 6565,3010 9170,3010 9180,3000 9420,3000 9460,3040 v1(9735,3040)
/TVRAM27: U6.15 U12.56 U13.56 U14.56 U15.56 U16.56 U17.56 U18.56 U19.56 U22.58 | length 7496.4
  top_copper w7.87: U6.15@5865,935 5680,935 5670,945 5670,1290 5680,1300 5950,1300 6040,1390 U13.56@6040,1500 U14.56@6040,1850 U12.56@6040,2200 U16.56@6040,2550 U15.56@6040,2900 v1(6040,3045) U17.56@6040,3250 U18.56@6040,3600 U19.56@6040,3950 ; v1(9690,3005) 9760,3005 9805,3050 9805,3127 9797,3135 U22.58@9797,3190
  Bottom Layer w7.87: v1(6040,3045) 6090,3045 6120,3015 6185,3015 6205,2995 6375,2995 6395,3015 6535,3015 6560,2990 9165,2990 9175,2980 9425,2980 9450,3005 v1(9690,3005)
/TVRAM28: U6.14 U12.58 U13.58 U14.58 U15.58 U16.58 U17.58 U18.58 U19.58 U22.59 | length 7606.6
  top_copper w7.87: U6.14@5865,885 5660,885 5650,895 5650,1315 5655,1320 5820,1320 5860,1360 5915,1360 5940,1385 U13.58@5940,1500 U14.58@5940,1850 U12.58@5940,2200 U16.58@5940,2550 U15.58@5940,2900 v1(5940,2965) U17.58@5940,3250 U18.58@5940,3600 U19.58@5940,3950 ; v1(9735,2970) 9750,2970 9825,3045 9825,3131 9816,3140 U22.59@9816,3190
  Bottom Layer w7.87: v1(5940,2965) 5970,2965 5980,2955 6980,2955 6995,2970 9160,2970 9170,2960 9435,2960 9445,2970 v1(9735,2970)